# Altium PCB NB3000XN.PcbDoc (part 36 of 71)
Units mil, origin at the board's own origin, x right, y up, seen from the top; angles counter-clockwise.
Board outline 9527.56 x 6929.77 mil, 6 copper layers (Top Layer, GND+SHIELD, MidLayer1, MidLayer2, P2 - 3V3+5V0, Bottom Layer), stack 62.375 mil thick; 832 components, 1027 nets, 4655 pads, 4981 vias.
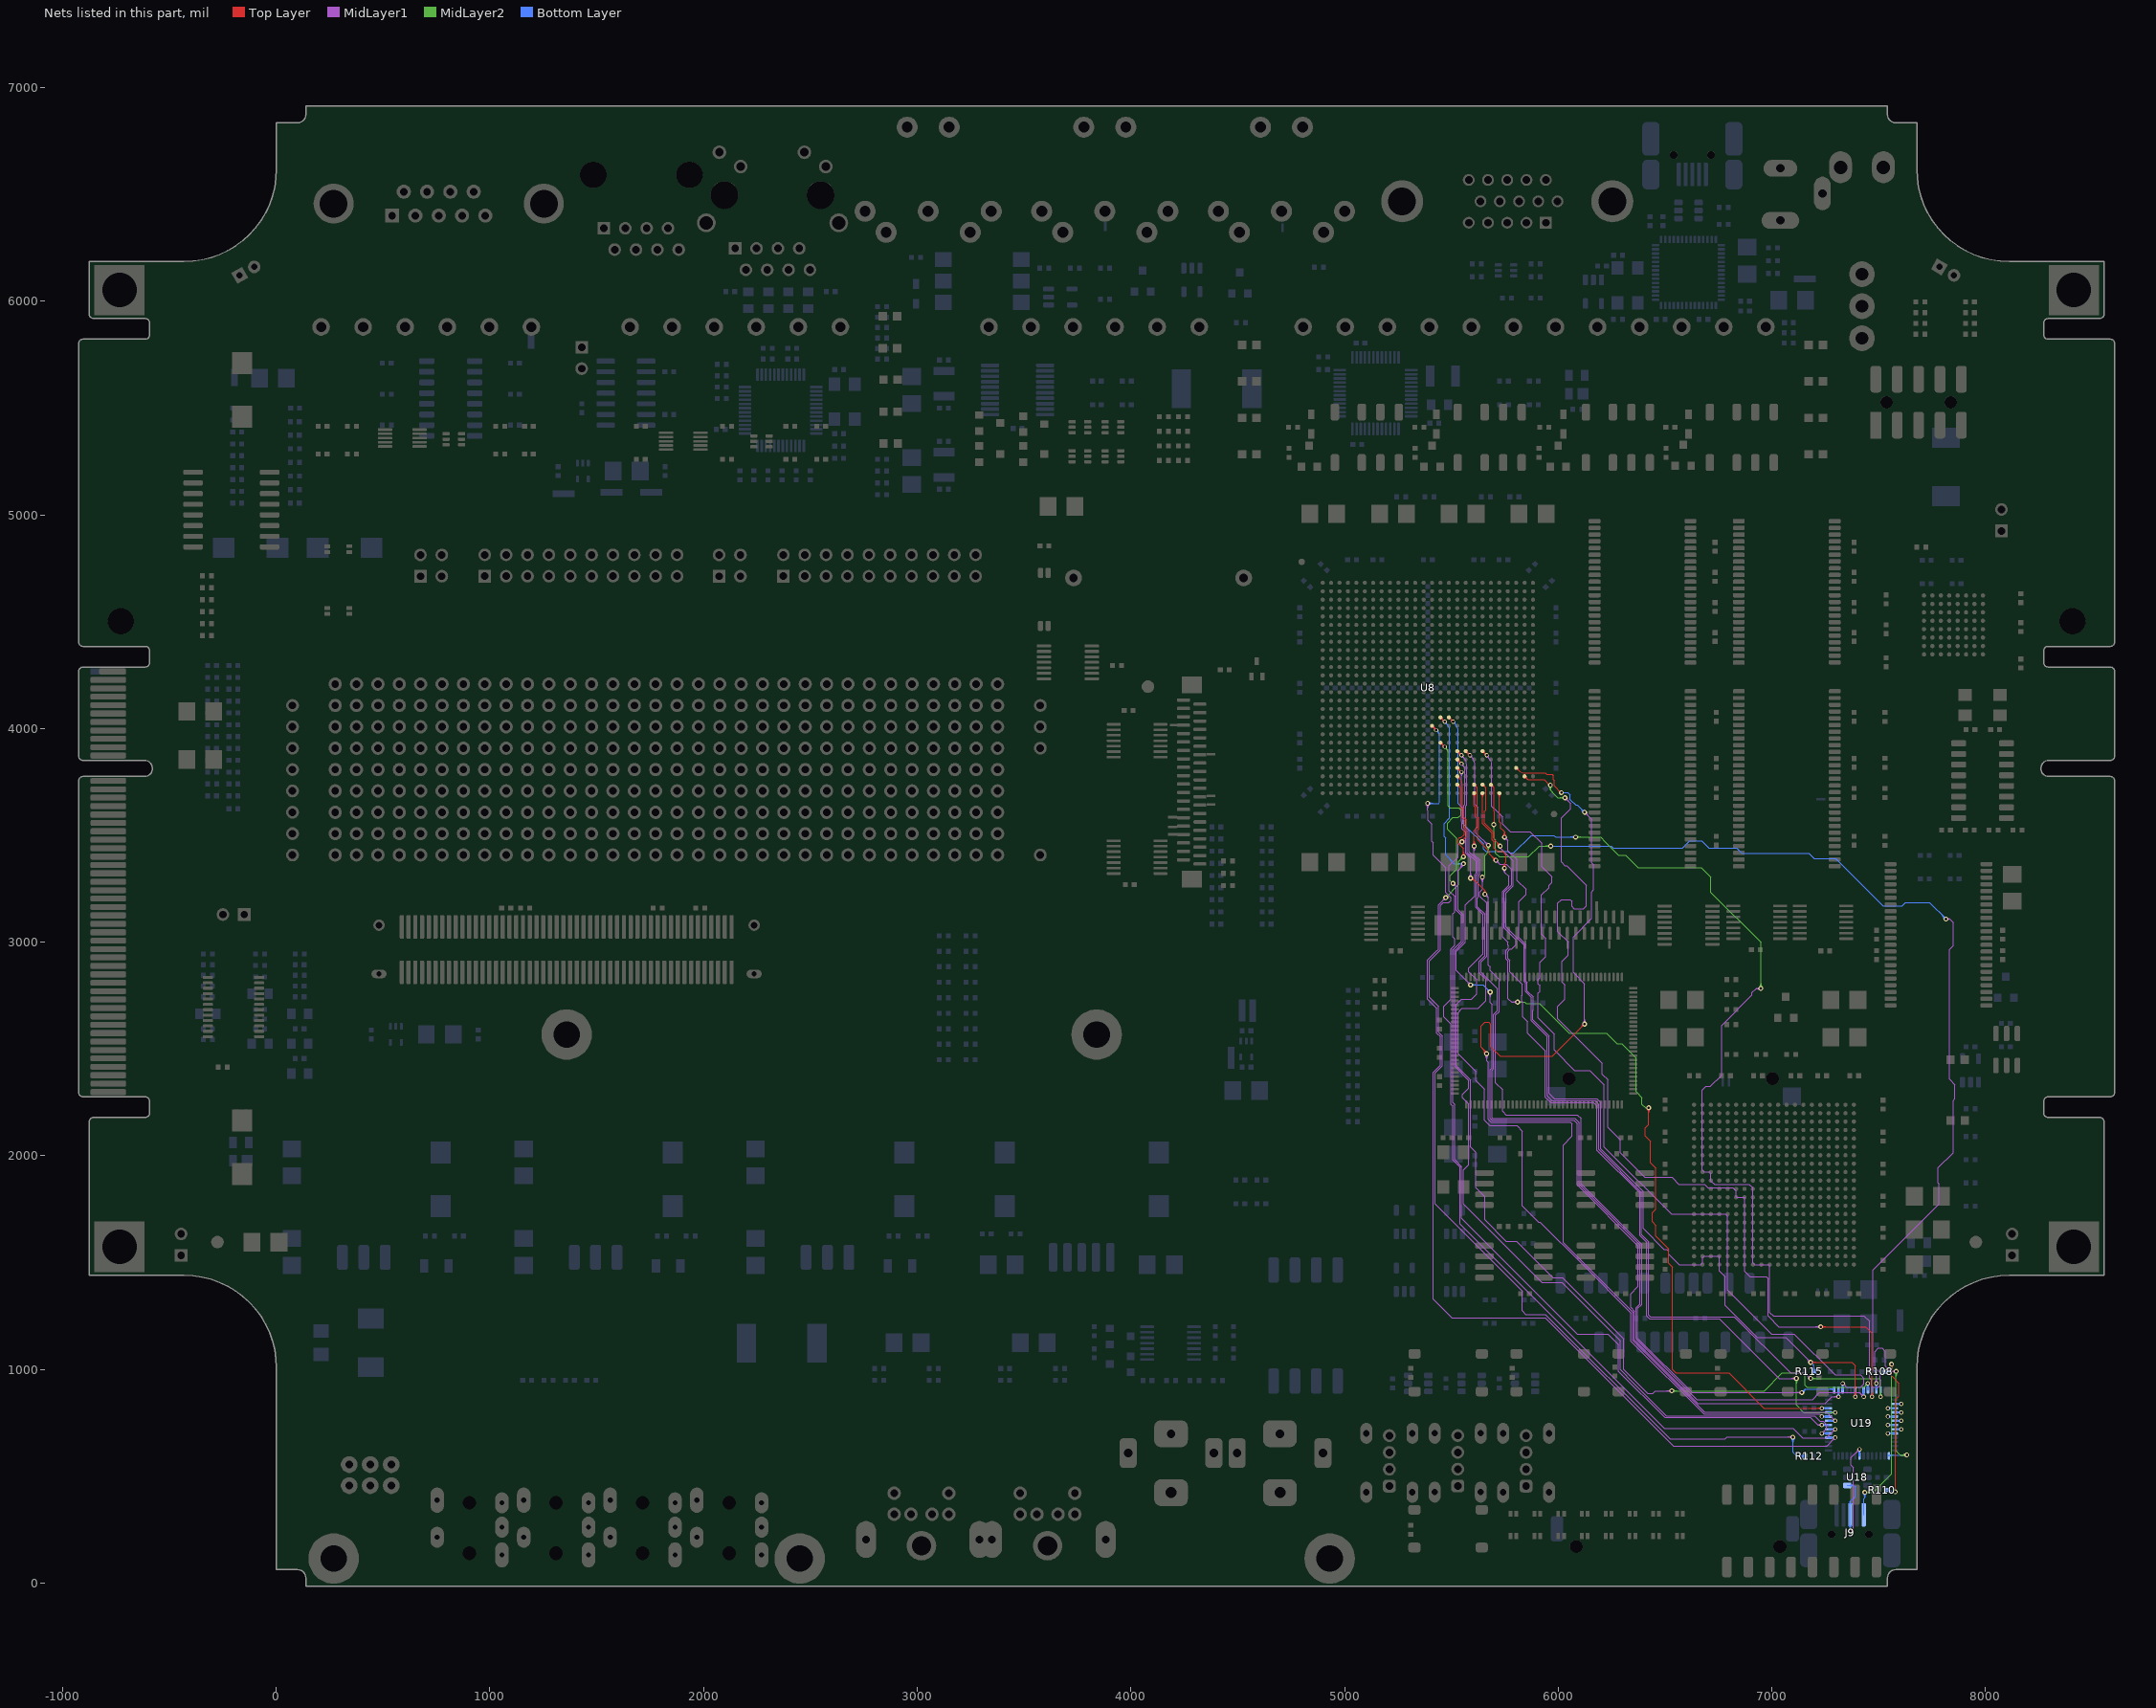
[diagram p40: the nets of this part, all layers, seen from the top]

## Via types
v1: diameter 23, hole 11.81, Top Layer to Bottom Layer, 3672 vias
v2: diameter 26, hole 11.81, Top Layer to Bottom Layer, 461 vias
v3: diameter 19, hole 11.81, Top Layer to Bottom Layer, tented both sides, 396 vias
v4: diameter 23.62, hole 11.81, Top Layer to Bottom Layer, 288 vias
v5: diameter 20, hole 11.81, Top Layer to Bottom Layer, 91 vias
v6: diameter 23, hole 11.81, Top Layer to Bottom Layer, tented both sides, 50 vias
v7: diameter 31, hole 11.81, Top Layer to Bottom Layer, 15 vias
v8: diameter 27.56, hole 11.81, Top Layer to Bottom Layer, tented both sides, 4 vias
v9: diameter 29, hole 11.81, Top Layer to Bottom Layer, 3 vias
v10: diameter 21, hole 11.81, Top Layer to Bottom Layer, 1 vias

## Nets (pads, with @x,y where several pads share a name; then routed paths per layer and width w, separated by ;. In a path a pad name is that pad's centre, name@x,y a point inside that pad or via, vN(x,y) a via of type N, cw(c..) or ccw(c..) an arc to the next point about the centre after c; other vN are vias at no path point) (continued)
DBUSB#.DPLUS: J9.3 U18.1 U19.8 | length 878.2
  MidLayer1 w5: v4(7367.01,242.01) 7381.47,256.47 7381.47,541.46 7370,552.93 7370,586.84 v5(7410.16,627) ; v5@7402.66,627 cw(c7384.55,627) 7397.35,614.2 cw(c7410.16,601.39) v5@7410.16,619.5
  Bottom Layer w5: U18.1@7352.76,457.6 7382.4,457.6 ; v4@7360.42,248.59 ccw(c7344.53,264.49) 7367.01,264.49 ccw(c7389.49,264.49) v4@7373.59,248.59 ; J9.3@7361.82,269.53 cw(c7349.28,257) 7367.01,257 cw(c7384.73,257) J9.3@7372.2,269.53 ; J9.3@7362.04,370.68 ccw(c7351.61,382.01) 7367.01,382.01 ; v4@7365,240 v4(7367.01,242.01) J9.3@7367.01,320 7367.01,382.01 ; U18.1@7367.41,450.47 cw(c7382.4,438.26) 7382.4,457.6 ; U18.1@7367.41,464.72 ccw(c7382.4,476.94) 7382.4,457.6 ; J9.3@7371.98,370.68 cw(c7382.4,382.01) 7367.01,382.01 ; 7367.01,382.01 7389.5,404.5 7389.5,450.5 7382.4,457.6
  Bottom Layer w8: v5@7405.91,622.76 cw(c7395.67,612.51) 7410.16,612.51 cw(c7424.64,612.51) v5@7414.4,622.76 ; U19.8@7410.16,595.67 v5(7410.16,627)
DBUSB#.VBUS: J9.1 R108.2 R110.1 | length 1876.7
  Top Layer w4: v1@7553.51,1018.28 cw(c7537.85,1002.62) 7560,1002.62 ; v1@7556.34,1021.11 cw(c7547.51,1012.28) 7560,1012.28 ; 7560,1001.51 cw(c7583.72,1001.51) v1@7566.95,1018.28 ; 7560,1011.16 cw(c7574.07,1011.16) v1@7564.12,1021.11 ; v1@7560.23,1024.77 7560,1025 7560,970 7595,935 7595,875 7577.85,857.85 v1(7577.85,427.15)
  MidLayer2 w4: v1(7435,425) 7473.48,425 7560.23,511.75 v1(7560.23,1025) ; v1@7438.89,421.11 cw(c7448.28,411.72) 7448.28,425 cw(c7448.28,438.28) v1@7438.89,428.89 ; v1@7441.72,418.28 cw(c7457.94,402.06) 7457.94,425 cw(c7457.94,447.93) v1@7441.72,431.72 ; v1@7553.51,1018.28 cw(c7537.3,1002.06) 7560.23,1002.06 cw(c7583.17,1002.06) v1@7566.95,1018.28 ; v1@7556.34,1021.11 cw(c7546.95,1011.72) 7560.23,1011.72 cw(c7573.51,1011.72) v1@7564.12,1021.11
  Bottom Layer w4: v1@7428.28,418.28 cw(c7412.06,402.06) 7435,402.06 cw(c7457.94,402.06) v1@7441.72,418.28 ; J9.1@7430,320 7430,395 7435,400 v1(7435,425) ; v1@7431.11,421.11 cw(c7421.72,411.72) 7435,411.72 cw(c7448.28,411.72) v1@7438.89,421.11 ; R108.2@7526.18,990 7551.82,990 7560,998.18 7560,1025 v1(7560.23,1025) ; R108.2@7529.94,986.24 cw(c7539.02,977.16) 7539.02,990 cw(c7539.02,1002.84) R108.2@7529.94,993.76 ; R108.2@7532.77,983.41 cw(c7548.68,967.5) 7548.68,990 cw(c7548.68,1012.5) R108.2@7532.77,996.59 ; R110.1@7536.18,435 7555,435 ; R110.1@7543.59,429.35 cw(c7555,420.66) 7555,435 ; R110.1@7543.59,440.65 ccw(c7555,449.34) 7555,435 ; v1@7553.51,1018.28 cw(c7537.85,1002.62) 7560,1002.62 ; v1@7556.34,1021.11 cw(c7547.51,1012.28) 7560,1012.28 ; 7560,1001.51 cw(c7583.72,1001.51) v1@7566.95,1018.28 ; 7560,1011.16 cw(c7574.07,1011.16) v1@7564.12,1021.11 ; v1(7577.85,427.15) 7562.85,427.15 7555,435
DBUSB.D0: U8.AE17 U19.18 | length 5113.6
  Top Layer w4: v1@5550.14,3406.76 ccw(c5533.92,3422.98) 5556.86,3422.98 ccw(c5579.79,3422.98) v1@5563.57,3406.76 ; v1@5552.97,3403.93 ccw(c5543.58,3413.32) 5556.86,3413.32 ccw(c5570.14,3413.32) v1@5560.75,3403.93 ; v1(5556.86,3400.04) 5556.86,3438.04 5531.02,3463.87 5531.02,3482.29 5537.92,3489.19 5545.69,3489.19 5560.81,3504.31 5560.81,3570.31 5551.17,3579.96 5551.17,3621.52 5543.3,3629.39 5543.3,3660 5543.3,3670 5543.3,3717.53 ; 5540.33,3724.71 cw(c5533.15,3717.53) 5543.3,3717.53 ; 5540.33,3724.71 cw(c5533.15,3717.53) 5543.3,3717.53 ; 5540.33,3724.71 ccw(c5527.8,3712.17) 5527.8,3729.9 cw(c5527.8,3712.17) 5540.33,3724.71 ; 5540.33,3724.71 cw(c5552.86,3737.24) 5535.14,3737.24 ccw(c5552.86,3737.24) 5540.33,3724.71
  MidLayer1 w4: v1@5464.02,3208.37 cw(c5441.09,3208.37) 5457.31,3192.16 cw(c5473.52,3175.94) v1@5473.52,3198.87 ; v1@5465.19,3208.37 v1(5473.52,3208.37) 5448.52,3183.37 5440.19,3175.04 5440.19,3044.69 5440.19,3035 5440.19,2967.22 5431.47,2958.5 5431.12,2958.5 5411.5,2938.88 5411.5,2938.53 5389.52,2916.56 5389.52,2734.04 5431.86,2691.71 5431.86,2575.04 5448.52,2558.37 5448.52,2425.04 5415.19,2391.71 5415.19,1329.81 5503.29,1241.71 5940.19,1241.71 6540.19,641.71 7257.6,641.71 v5(7297,681.1) v5@7298.52,681.11 ; v1@5468.02,3208.37 cw(c5454.75,3208.37) 5464.14,3198.99 cw(c5473.52,3189.6) v1@5473.52,3202.87 ; v5@7289,681.1 cw(c7269.69,681.1) 7283.34,667.45 cw(c7297,653.79) v5@7297,673.1
  MidLayer2 w4: v1(5473.52,3208.37) 5535,3269.85 5535,3378.18 v1(5556.86,3400.04) v1@5556.86,3393.37 ; v1@5473.52,3213.87 ccw(c5473.52,3227.15) 5482.91,3217.76 ccw(c5492.3,3208.37) v1@5479.02,3208.37 ; v1@5473.52,3217.87 ccw(c5473.52,3240.81) 5489.74,3224.59 ccw(c5505.96,3208.37) v1@5483.02,3208.37 ; v1@5547.36,3400.04 cw(c5524.42,3400.04) 5540.64,3383.82 cw(c5556.86,3367.61) v1@5556.86,3390.54 ; v1@5551.36,3400.04 cw(c5538.08,3400.04) 5547.47,3390.65 cw(c5556.86,3381.26) v1@5556.86,3394.54
  Bottom Layer w8: U19.18@7265.67,681.1 v5(7297,681.1) ; v5@7292.76,676.86 ccw(c7282.51,666.62) 7282.51,681.1 ccw(c7282.51,695.59) v5@7292.76,685.35
DBUSB.D1: U8.U15 U19.19 | length 5063.4
  Top Layer w4: U8.U15@5449.06,4044.7 cw(c5449.06,4026.6) 5461.86,4039.4 cw(c5474.66,4052.2) U8.U15@5456.56,4052.2 ; U8.U15@5449.06,4044.86 cw(c5449.06,4027.14) 5461.59,4039.67 cw(c5474.12,4052.2) U8.U15@5456.4,4052.2 ; U8.U15@5449.06,4052.2 v3(5468.74,4032.52) ; 5455.94,4045.32 cw(c5443.13,4032.52) 5461.24,4032.52 ccw(c5443.13,4032.52) 5455.94,4045.32 ; 5455.94,4045.32 ccw(c5468.74,4058.13) 5468.74,4040.02 cw(c5468.74,4058.13) 5455.94,4045.32
  MidLayer1 w4: 5535.93,3340.11 ccw(c5508.33,3367.71) v1@5547.36,3367.71 ; 5542.75,3346.94 ccw(c5521.98,3367.71) v1@5551.36,3367.71 ; 5549.58,3353.77 ccw(c5535.64,3367.71) v1@5555.36,3367.71 ; 5552.02,3356.2 cw(c5556.86,3351.37) v1@5556.86,3358.21 ; v1(5556.86,3367.71) 5556.86,3361.04 5531.86,3336.04 5531.86,3152.36 5556.86,3127.36 5556.86,3002.02 5515.19,2960.35 5515.19,2418.69 5581.86,2352.02 5581.86,2317.05 5552.19,2287.38 5552.19,2272.62 5581.86,2242.95 5581.86,1958.37 5556.86,1933.37 5556.86,1775.04 5731.86,1600.04 5923.52,1408.37 6016.82,1408.37 6290.19,1135 6290.19,1000.04 6349.65,940.58 6506.86,783.37 7200,783.37 7225,758.37 7240.19,758.37 7256.86,741.71 7256.86,723.31 v5(7234.34,700.79) ; v5@7234.34,708.79 ccw(c7234.34,728.1) 7247.99,714.44 ccw(c7261.66,700.79) v5@7242.34,700.79
  Bottom Layer w4: v3@5468.09,4025.05 cw(c5466.51,4007.01) 5480.38,4018.65 ; v3@5476.21,4031.87 ccw(c5494.25,4030.29) 5480.38,4018.65 ; v1@5550.14,3360.99 ccw(c5533.92,3344.77) 5533.92,3367.71 ccw(c5533.92,3390.64) v1@5550.14,3374.43 ; v1@5552.97,3363.82 ccw(c5543.58,3354.43) 5543.58,3367.71 ccw(c5543.58,3380.99) v1@5552.97,3371.6 ; v1(5556.86,3367.71) 5514.92,3367.71 5473.19,3409.44 5473.19,3487.36 5465.8,3494.75 5465.8,3555 5492.6,3581.8 5492.6,3660 5492.6,3670 5492.6,3876.1 5492.6,3895.52 5492.6,3969.64 5492.6,3989.14 ccw(c5450.87,3989.14) 5480.38,4018.65
  Bottom Layer w8: v5(7234.34,700.79) U19.19@7265.67,700.79 ; v5@7238.58,696.54 cw(c7248.82,686.3) 7248.82,700.79 cw(c7248.82,715.27) v5@7238.58,705.03
DBUSB.D2: U8.AD17 U19.20 | length 4643.9
  Top Layer w4: v1(5550,3470) 5550,3473.56 5548.52,3475.04 5560.19,3486.71 ; v1@5550,3479.5 ccw(c5550,3486.7) 5555.09,3481.61 ; v1@5554.85,3472.59 cw(c5562.56,3476.71) 5556.38,3482.89 ; v1@5558.38,3474.48 cw(c5567.53,3479.37) 5560.19,3486.71 ; 5540.33,3764.08 cw(c5512.98,3736.73) 5551.66,3736.73 ; 5540.33,3764.08 cw(c5512.98,3736.73) 5551.66,3736.73 ; 5540.33,3764.08 cw(c5552.86,3776.61) 5535.14,3776.61 ccw(c5552.86,3776.61) 5540.33,3764.08 ; 5540.33,3764.08 ccw(c5527.8,3751.55) 5527.8,3769.27 cw(c5527.8,3751.55) 5540.33,3764.08 ; 5551.66,3736.73 5551.66,3670 5551.66,3660 5551.66,3633.34 5559.17,3625.83 5559.17,3620 5559.17,3612.36 5559.17,3583.27 5568.81,3573.63 5568.81,3564 5568.81,3495.33 5560.19,3486.71
  MidLayer1 w4: 5533.74,3460.26 cw(c5545.25,3448.76) v1@5548.8,3464.63 ; 5538.39,3464.91 ccw(c5533.3,3470) v1@5540.5,3470 ; 5538.89,3465.4 cw(c5547.13,3457.16) v1@5549.67,3468.54 ; v1(5550,3470) 5550,3473.56 5548.52,3475.04 5546.74,3473.26 5531.86,3458.37 5531.86,3399.37 5489.86,3357.37 5489.86,3239.67 5515.19,3214.34 5515.19,3141.71 5506.86,3133.37 5506.86,3025.04 5516.19,3015.71 5516.19,2986.19 5498.52,2968.52 5498.52,2733.37 5464.19,2699.04 5464.19,2651.04 5498.52,2616.71 5498.52,2241.71 5506.86,2233.37 5506.86,1980.39 5540.19,1947.06 5540.19,1681.37 6088.19,1133.37 6496.5,725.04 7098.52,725.04 7143.56,680 7256.53,680 v5@7290.19,713.66 ; v5@7289,720.47 cw(c7269.69,720.47) 7283.34,706.82 cw(c7297,693.16) v5@7297,712.47 ; v5@7290.19,713.66 v5(7297,720.47) 7290.19,720.47 v5@7290.19,713.66
  Bottom Layer w8: U19.20@7265.67,720.47 v5(7297,720.47) ; v5@7292.76,716.23 ccw(c7282.51,705.99) 7282.51,720.47 ccw(c7282.51,734.96) v5@7292.76,724.72
DBUSB.D3: U8.Y15 U19.21 | length 4912.9
  Top Layer w4: U8.Y15@5449.06,3926.59 cw(c5449.06,3908.49) 5461.86,3921.29 cw(c5474.66,3934.09) U8.Y15@5456.56,3934.09 ; U8.Y15@5449.06,3926.75 cw(c5449.06,3909.03) 5461.59,3921.56 cw(c5474.12,3934.09) U8.Y15@5456.4,3934.09 ; U8.Y15@5449.06,3934.09 v3(5468.74,3914.41) ; 5455.94,3927.21 cw(c5443.13,3914.41) 5461.24,3914.41 ccw(c5443.13,3914.41) 5455.94,3927.21 ; 5455.94,3927.21 ccw(c5468.74,3940.02) 5468.74,3921.91 cw(c5468.74,3940.02) 5455.94,3927.21
  MidLayer1 w4: 5506.7,2919.53 5506.7,2963.17 5548.52,3005 5548.52,3124.37 5523.52,3149.37 5523.52,3259.04 ; 5506.86,2919.53 5506.86,2250.04 5515.19,2241.71 5515.19,1983.37 5548.52,1950.04 5548.52,1708.37 6090.19,1166.71 6231.86,1166.71 6281.86,1116.71 6281.86,991.71 6498.52,775.04 7179.96,775.04 7214.84,740.16 ; v1(5507.52,3275.04) 5523.52,3259.04 ; v1@5507.58,3269.54 cw(c5507.7,3256.69) 5516.79,3265.78 cw(c5525.87,3274.86) v1@5513.02,3274.99 ; v1@5507.62,3265.54 cw(c5507.83,3243.35) 5523.52,3259.04 ; v1@5517.02,3274.95 ccw(c5539.22,3274.74) 5523.52,3259.04 ; 7215,740 7214.84,740.16 ; v5@7228.68,734.5 ccw(c7215.03,720.85) 7215.03,740.16 ccw(c7215.02,759.47) v5@7228.68,745.81 ; v5(7234.34,740.16) 7214.84,740.16
  MidLayer2 w4: v3@5468.09,3906.94 cw(c5466.51,3888.9) 5480.38,3900.54 cw(c5494.25,3912.18) v3@5476.21,3913.76 ; 5480.13,3900.83 cw(c5470.2,3890.9) 5484.25,3890.9 ; 5484.25,3680.84 5484.25,3739.1 ; 5484.25,3876.97 5484.25,3890.9 ; v1(5507.52,3275.04) 5493.52,3289.04 5493.52,3311.71 5524.02,3342.21 5524.02,3486.17 5481.86,3528.33 5481.86,3558.37 5506.86,3583.37 5532.86,3583.37 5544.52,3595.04 5544.52,3617.04 5533.56,3628 5493.29,3628 5484.25,3637.04 5484.25,3660 5484.25,3670 5484.25,3739.1 ; 5484.25,3739.1 5484.25,3797.36 5484.25,3890.9
  Bottom Layer w8: v5(7234.34,740.16) U19.21@7265.67,740.16 ; v5@7238.58,735.91 cw(c7248.82,725.67) 7248.82,740.16 cw(c7248.82,754.64) v5@7238.58,744.4
DBUSB.D4: U8.AC24 U19.22 | length 5835.8
  Top Layer w4: 5645.2,2503.36 cw(c5619.88,2478.04) v1@5655.69,2478.04 ; 5652.03,2496.54 cw(c5633.53,2478.04) v1@5659.69,2478.04 ; 5658.08,2490.49 ccw(c5665.19,2497.6) v1@5665.19,2487.54 ; 5658.86,2489.71 cw(c5647.19,2478.04) v1@5663.69,2478.04 ; v1(5665.19,2478.04) 5665.19,2483.37 5640.19,2508.37 5640.19,2608.37 5656.86,2625.04 5675,2625.04 5685,2615.04 5685,2510 5728.29,2466.71 5973.52,2466.71 v1(6123.52,2616.71) ; 5971.94,3784.71 5976.5,3780.15 ; v1(6015.19,3700.04) 6012.14,3700.04 5981.19,3731 5981.19,3756.43 5976.5,3761.12 5976.5,3780.15 ; v1@6114.02,2616.71 cw(c6091.09,2616.71) 6107.31,2600.49 cw(c6123.52,2584.27) v1@6123.52,2607.21 ; v1@6118.02,2616.71 cw(c6104.75,2616.71) 6114.14,2607.32 cw(c6123.52,2597.93) v1@6123.52,2611.21 ; 5815.92,3803.45 ccw(c5803.39,3790.92) 5803.39,3808.64 cw(c5803.39,3790.92) 5815.92,3803.45 ; 5815.92,3803.45 cw(c5828.45,3815.98) 5810.73,3815.98 ccw(c5828.45,3815.98) 5815.92,3803.45 ; 5843.27,3792.12 cw(c5843.27,3830.8) 5815.92,3803.45 ccw(c5843.27,3830.8) 5843.27,3792.12 ; 5843.27,3792.12 5910,3792.12 5920,3792.12 5939.38,3792.12 5946.29,3785.21 5971.44,3785.21 5976.5,3780.15
  MidLayer1 w4: v1@5658.47,2471.32 cw(c5642.26,2455.11) 5665.19,2455.11 cw(c5688.13,2455.11) v1@5671.91,2471.32 ; v1@5661.3,2474.15 cw(c5651.91,2464.76) 5665.19,2464.76 cw(c5678.47,2464.76) v1@5669.08,2474.15 ; v1(5665.19,2478.04) 5665.19,2444.69 5673.52,2436.35 5673.52,2172.06 5687.21,2158.37 6056.86,2158.37 6065.19,2150.04 6065.19,2092.71 6023.52,2051.04 6023.52,1593.02 6348.52,1268.02 6348.52,1136.35 6684.84,800.04 7256.8,800.04 v5(7297,759.84) 7298.52,759.84 v5@7298.52,766.71 ; v1@6116.81,2623.43 ccw(c6100.59,2639.64) 6123.52,2639.64 ccw(c6146.46,2639.64) v1@6130.24,2623.43 ; v1@6119.64,2620.6 ccw(c6110.25,2629.99) 6123.52,2629.99 ccw(c6136.8,2629.99) v1@6127.41,2620.6 ; v1(6123.52,2616.71) 6123.52,2805.71 6070.86,2858.37 6070.86,3025.04 6156.86,3111.04 6156.86,3210 6156.86,3235.69 6166.19,3245.02 6166.19,3250.04 6166.19,3275 6166.19,3362.12 6156.86,3371.45 6156.86,3575.04 v1(6123.52,3608.37) ; v1@6123.52,3598.87 cw(c6123.52,3575.94) 6139.74,3592.16 cw(c6155.96,3608.37) v1@6133.02,3608.37 ; v1@6123.52,3602.87 cw(c6123.52,3589.6) 6132.91,3598.99 cw(c6142.3,3608.37) v1@6129.02,3608.37 ; v5@7289,759.84 ccw(c7269.69,759.84) 7283.34,773.5 ccw(c7297,787.16) v5@7297,767.84
  Bottom Layer w4: v1(6015.19,3700.04) 6045.18,3700.03 6056.86,3688.37 6056.86,3666.71 6081.86,3641.71 6090.19,3641.71 v1(6123.52,3608.37) ; v1@6114.02,3608.37 ccw(c6091.09,3608.37) 6107.31,3624.59 ccw(c6123.52,3640.81) v1@6123.52,3617.87 ; v1@6118.02,3608.37 ccw(c6104.75,3608.37) 6114.13,3617.76 ccw(c6123.52,3627.15) v1@6123.52,3613.87
  Bottom Layer w8: U19.22@7265.67,759.84 v5(7297,759.84) ; v5@7292.76,755.6 ccw(c7282.51,745.36) 7282.51,759.84 ccw(c7282.51,774.33) v5@7292.76,764.09
DBUSB.D5: U8.AF19 U19.23 | length 4406.9
  Top Layer w4: v1@5600.14,3456.76 ccw(c5583.92,3472.98) 5606.86,3472.98 ccw(c5629.79,3472.98) v1@5613.57,3456.76 ; U8.AF19@5601.23,3692.57 cw(c5588.43,3679.77) 5606.54,3679.77 cw(c5624.64,3679.77) U8.AF19@5611.84,3692.57 ; U8.AF19@5601.34,3692.68 cw(c5588.81,3680.15) 5606.54,3680.15 cw(c5624.26,3680.15) U8.AF19@5611.73,3692.68 ; v1@5602.97,3453.93 ccw(c5593.58,3463.32) 5606.86,3463.32 ccw(c5620.14,3463.32) v1@5610.75,3453.93 ; U8.AF19@5606.54,3697.87 5606.54,3670 5606.54,3660 5606.54,3637.11 5611.69,3631.96 5611.69,3586.87 5620,3578.56 5620,3534.23 5606.86,3521.09 v1(5606.86,3450.04)
  MidLayer1 w4: v1@5600.14,3443.32 cw(c5583.92,3427.11) 5606.86,3427.11 cw(c5629.79,3427.11) v1@5613.57,3443.32 ; v1@5602.97,3446.15 cw(c5593.58,3436.76) 5606.86,3436.76 cw(c5620.14,3436.76) v1@5610.75,3446.15 ; v1(5606.86,3450.04) 5606.86,3410.32 5632.19,3384.98 5632.19,3316.94 5625.19,3309.94 5625.19,3211.04 5622.52,3208.37 5622.52,3166.04 5657.19,3131.37 5657.19,2937.69 5630,2910.5 5630,2857.25 5660.86,2826.39 5660.86,2725.86 5625,2690 5550,2690 5531.19,2671.19 5531.19,2478 5615.19,2394 5615.19,2352.63 5655.41,2312.41 5655.41,2166.3 5680,2141.71 5806.86,2141.71 5832.5,2116.06 5832.5,1766.06 5908.52,1690.04 5915.19,1690.04 6113.52,1491.71 6340.52,1264.71 6340.52,1133.04 6681.86,791.71 7200,791.71 7222.16,791.71 v5(7234.34,779.53) 7231.86,779.52 v5@7231.86,779.71
  Bottom Layer w8: v5(7234.34,779.53) U19.23@7265.67,779.53 ; v5@7238.58,775.28 cw(c7248.82,765.04) 7248.82,779.53 cw(c7248.82,794.01) v5@7238.58,783.77
DBUSB.D6: U8.AE19 U19.24 | length 4633.8
  Top Layer w4: U8.AE19@5606.54,3729.9 cw(c5606.54,3712.17) 5619.07,3724.71 ; U8.AE19@5613.88,3737.24 ccw(c5631.6,3737.24) 5619.07,3724.71 ; v1@5698.56,3383.58 ccw(c5675.63,3383.58) 5691.85,3399.8 ccw(c5708.06,3416.02) v1@5708.06,3393.08 ; v1@5702.56,3383.58 ccw(c5689.29,3383.58) 5698.67,3392.97 ccw(c5708.06,3402.36) v1@5708.06,3389.08 ; v1@5706.86,3384.79 5677.36,3414.28 5677.36,3424.2 5623.52,3478.04 5623.52,3525 5628,3529.48 5628,3581.88 5622.04,3587.84 5622.04,3660 5622.04,3670 5622.04,3717.53 ccw(c5611.89,3717.53) 5619.07,3724.71
  MidLayer1 w4: v1@5706.86,3382.37 v1(5708.06,3383.58) 5727.6,3364.04 5757.52,3364.04 5781.86,3339.71 5781.86,3268.04 5747.86,3234.04 5747.86,3067.33 5803.48,3011.71 5803.48,2988.29 5782.73,2967.54 5774.61,2967.54 5764.36,2957.29 5764.36,2924.11 5773.19,2915.28 5773.19,2860.5 5827,2806.69 ; v1@5708.06,3374.08 cw(c5708.06,3351.15) 5724.28,3367.36 cw(c5740.5,3383.58) v1@5717.56,3383.58 ; v1@5708.06,3378.08 cw(c5708.06,3364.8) 5717.45,3374.19 cw(c5726.84,3383.58) v1@5713.56,3383.58 ; 5787.06,2846.63 5831.36,2802.32 5831.36,2752.26 5829.19,2750.09 5829.19,2724.31 5833.69,2719.81 5833.69,2650.21 ; v1@7108.47,951.66 ccw(c7092.26,935.44) 7092.26,958.37 ccw(c7092.26,981.31) v1@7108.47,965.09 ; v1@7111.3,954.49 ccw(c7101.91,945.1) 7101.91,958.37 ccw(c7101.91,971.65) v1@7111.3,962.26 ; v1(7115.19,958.37) 7065,958.37 7048.52,958.37 7034.84,958.37 6755.21,1238 6702,1238 6428.31,1238 6414.81,1251.5 6414.81,1595.07 6382.19,1627.69 6382.19,1826.1 6181.86,2026.43 6181.86,2233.37 6165.19,2250.04 5965.19,2250.04 5940.19,2275.04 5940.19,2491.71 5856.86,2575.04 5856.86,2627.04 ; 5833.69,2650.21 5856.86,2627.04 ; 5833.69,2650.21 5856.86,2627.04
  MidLayer2 w4: v1@7108.47,951.66 cw(c7092.26,935.44) 7115.19,935.44 cw(c7138.13,935.44) v1@7121.91,951.66 ; v1@7111.3,954.49 cw(c7101.91,945.1) 7115.19,945.1 cw(c7128.47,945.1) v1@7119.08,954.49 ; v1(7115.19,958.37) 7115.19,833.37 7149.35,799.21 v5(7297,799.21) ; v5@7291.34,793.56 ccw(c7277.68,779.89) 7277.68,799.21 ccw(c7277.69,818.52) v5@7291.34,804.87
  Bottom Layer w8: U19.24@7282.51,799.21 cw(c7282.51,784.73) 7292.76,794.97 ccw(c7282.51,784.73) U19.24@7282.51,799.21 ; U19.24@7282.51,799.21 ccw(c7282.51,813.7) 7292.76,803.46 cw(c7282.51,813.7) U19.24@7282.51,799.21 ; U19.24@7265.67,799.21 v5(7297,799.21) U19.24@7265.67,799.21
DBUSB.D7: U8.AF20 U19.25 | length 4530.8
  Top Layer w4: U8.AF20@5640.6,3692.57 cw(c5627.8,3679.77) 5645.91,3679.77 cw(c5664.01,3679.77) U8.AF20@5651.21,3692.57 ; U8.AF20@5645.91,3697.87 5645.91,3670 5645.91,3660 5645.91,3555.41 5690.86,3510.46 5690.86,3478.33 5699.19,3470 5699.19,3441.71 5715.86,3425.04 5740.19,3425.04 5756.86,3408.37 5756.86,3375 5748.52,3366.67 ; v1@5742.44,3353.67 ccw(c5731.6,3366.67) 5748.52,3366.67 ; v1@5745,3350.6 ccw(c5738.73,3358.12) 5748.52,3358.12 ccw(c5758.32,3358.12) v1@5752.05,3350.6 ; v1(5748.52,3346.37) 5748.52,3366.67 ; v1@5754.61,3353.67 cw(c5765.44,3366.67) 5748.52,3366.67 ; v1@6416.81,2218.32 cw(c6400.59,2202.11) 6423.52,2202.11 cw(c6446.46,2202.11) v1@6430.24,2218.32 ; v1@6419.64,2221.15 cw(c6410.25,2211.76) 6423.52,2211.76 cw(c6436.8,2211.76) v1@6427.41,2221.15 ; v1(6423.52,2225.04) 6423.52,2146.67 6406.86,2130 6406.86,2093.33 6431.86,2068.33 6431.86,1966.71 6456.86,1941.71 6456.86,1750.04 6440.19,1733.37 6440.19,1691.71 6456.86,1675.04 6456.86,1625.04 6518.19,1563.71 6518.19,1496.81 6535,1480 6535,1000 6551.63,983.37 6798.52,983.37 6956.86,825.04 6963,818.9 v5(7234.34,818.9) ; v5@7228.68,813.24 ccw(c7215.02,799.58) 7215.02,818.9 ccw(c7215.02,838.21) v5@7228.68,824.55 ; 5645.91,3680.15 cw(c5663.63,3680.15) 5651.1,3692.68 ccw(c5663.63,3680.15) 5645.91,3680.15 ; 5645.91,3680.15 ccw(c5628.18,3680.15) 5640.71,3692.68 cw(c5628.18,3680.15) 5645.91,3680.15
  MidLayer1 w4: v1@5742.93,3338.69 cw(c5734.94,3327.71) 5748.52,3327.71 ; v1(5748.52,3346.37) 5748.52,3327.71 ; v1@5754.12,3338.69 ccw(c5762.11,3327.71) 5748.52,3327.71 ; v1@5803.28,2713.28 ccw(c5787.06,2697.06) 5787.06,2720 ccw(c5787.06,2742.93) v1@5803.28,2726.72 ; v1@5806.11,2716.11 ccw(c5796.72,2706.72) 5796.72,2720 ccw(c5796.72,2733.28) v1@5806.11,2723.89 ; v1(5810,2720) 5781.55,2720 5765,2736.55 5765,2912.15 5756.36,2920.8 5756.36,2960.6 5768,2972.25 5768,2983.79 5765,2986.79 5765,3000 5739.86,3025.14 5739.86,3237.35 5768.19,3265.69 5768.19,3308.04 5748.52,3327.71
  MidLayer2 w4: v1(5810,2720) 5843.77,2720 5850,2713.77 5913.54,2713.77 6052.31,2575 6225.04,2575 6275,2525.04 6298.52,2525.04 6365.19,2458.37 6365.19,2300.04 6392.86,2272.37 6392.86,2241.71 6409.52,2225.04 v1(6423.52,2225.04) ; v1@5813.89,2716.11 cw(c5823.28,2706.72) 5823.28,2720 cw(c5823.28,2733.28) v1@5813.89,2723.89 ; v1@5816.72,2713.28 cw(c5832.93,2697.06) 5832.93,2720 cw(c5832.93,2742.93) v1@5816.72,2726.72
  Bottom Layer w8: v5(7234.34,818.9) U19.25@7265.67,818.9 ; v5@7238.58,814.66 cw(c7248.82,804.41) 7248.82,818.9 cw(c7248.82,833.38) v5@7238.58,823.14
DBUSB.D8: U19.45 | length 54.1
  Bottom Layer w8: U19.45@7574.33,838.58 v5(7605.66,838.58) ; v5@7601.42,834.34 ccw(c7591.18,824.1) 7591.18,838.58 ccw(c7591.18,853.07) v5@7601.42,842.83
DBUSB.D9: U19.46 | length 54.1
  Bottom Layer w8: v5(7543,818.9) U19.46@7574.33,818.9 ; v5@7547.24,814.65 cw(c7557.48,804.41) 7557.48,818.9 cw(c7557.49,833.38) v5@7547.24,823.14
DBUSB.D10: U19.47 | length 54.1
  Bottom Layer w8: U19.47@7574.33,799.21 v5(7605.66,799.21) ; v5@7601.42,794.97 ccw(c7591.18,784.73) 7591.18,799.21 ccw(c7591.18,813.7) v5@7601.42,803.46
DBUSB.D11: U19.48 | length 54.1
  Bottom Layer w8: v5(7543,779.53) U19.48@7574.33,779.53 ; v5@7547.24,775.28 cw(c7557.48,765.04) 7557.48,779.53 cw(c7557.49,794.01) v5@7547.24,783.77
DBUSB.D12: U19.49 | length 54.1
  Bottom Layer w8: U19.49@7574.33,759.84 v5(7605.66,759.84) ; v5@7601.42,755.6 ccw(c7591.18,745.36) 7591.18,759.84 ccw(c7591.18,774.33) v5@7601.42,764.09
DBUSB.D13: U19.50 | length 54.1
  Bottom Layer w8: v5(7543,740.16) U19.50@7574.33,740.16 ; v5@7547.24,735.91 cw(c7557.48,725.67) 7557.48,740.16 cw(c7557.49,754.64) v5@7547.24,744.4
DBUSB.D14: U19.51 | length 54.1
  Bottom Layer w8: U19.51@7574.33,720.47 v5(7605.66,720.47) ; v5@7601.42,716.23 ccw(c7591.18,705.99) 7591.18,720.47 ccw(c7591.18,734.96) v5@7601.42,724.72
DBUSB.D15: U19.52 | length 54.1
  Bottom Layer w8: v5(7543,700.79) U19.52@7574.33,700.79 ; v5@7547.24,696.54 cw(c7557.48,686.3) 7557.48,700.79 cw(c7557.49,715.27) v5@7547.24,705.03
DBUSB.FIFOADR0: U8.AA17 U19.37 | length 5078.7
  Top Layer w4: U8.AA17@5527.8,3887.22 cw(c5527.8,3869.12) 5540.6,3881.92 cw(c5553.4,3894.72) U8.AA17@5535.3,3894.72 ; U8.AA17@5527.8,3887.38 cw(c5527.8,3869.66) 5540.33,3882.19 cw(c5552.86,3894.72) U8.AA17@5535.14,3894.72 ; U8.AA17@5527.8,3894.72 v3(5547.48,3875.04) ; 5534.68,3887.84 cw(c5521.87,3875.04) 5539.98,3875.04 ccw(c5521.87,3875.04) 5534.68,3887.84 ; 5534.68,3887.84 ccw(c5547.48,3900.65) 5547.48,3882.54 cw(c5547.48,3900.65) 5534.68,3887.84
  MidLayer1 w4: v3@5546.83,3867.57 cw(c5545.25,3849.53) 5559.12,3861.17 ; v3@5554.95,3874.39 ccw(c5572.99,3872.81) 5559.12,3861.17 ; 5571.34,3798.23 5571.34,3812.16 ; 6340,966.71 6418.21,888.5 6443.91,888.5 6455.45,900.04 v1(6531.86,900.04) ; 6340.19,966.71 6306.86,1000.04 6306.86,1143.14 6020,1430 5975,1430 5804.96,1600.04 5756.86,1600.04 5656.86,1700.04 5656.86,1808.37 5615.19,1850.04 5615.19,2016.71 5590.19,2041.71 5590.19,2355 5523.19,2422 5523.19,2708.04 5548.52,2733.37 5593.52,2733.37 5618.52,2758.37 5618.52,2825.04 5581.86,2861.71 5581.86,2878.37 5648.48,2945 5648.48,3128.77 5614.52,3162.73 5614.52,3211.69 5617.19,3214.35 5617.19,3313.25 5624.19,3320.25 5624.19,3381.67 5583.69,3422.17 5583.69,3521.31 5567.19,3537.81 5567.19,3638.31 5571.34,3642.47 5571.34,3660 5571.34,3670 5571.34,3718.62 5571.34,3738.04 5571.34,3812.16 ; v1@6525.14,893.32 ccw(c6508.92,877.11) 6508.92,900.04 ccw(c6508.92,922.98) v1@6525.14,906.76 ; v1@6527.97,896.15 ccw(c6518.58,886.76) 6518.58,900.04 ccw(c6518.58,913.32) v1@6527.97,903.93 ; 5559.12,3861.17 cw(c5529.61,3831.66) 5571.34,3831.66 5571.34,3812.16
  MidLayer2 w4: v1(6531.86,900.04) 6965.19,900.04 7048.52,983.37 7141.63,983.37 7155,970 7155,925 7163.29,916.71 7431.86,916.71 7448.52,933.37 7448.52,935.65 v5(7449.53,935.66) ; v1@6535.75,896.15 cw(c6545.14,886.76) 6545.14,900.04 cw(c6545.14,913.32) v1@6535.75,903.93 ; v1@6538.57,893.32 cw(c6554.79,877.11) 6554.79,900.04 cw(c6554.79,922.98) v1@6538.57,906.76 ; 7434.96,919.81 ccw(c7419.12,935.66) v5@7441.53,935.66 ; 7438.06,922.91 cw(c7449.53,911.45) v5@7449.53,927.66 ; 7441.79,926.64 ccw(c7432.77,935.66) v5@7445.53,935.66
  Bottom Layer w8: v5@7445.28,931.42 cw(c7435.04,921.18) 7449.53,921.18 cw(c7464.01,921.18) v5@7453.77,931.42 ; U19.37@7449.53,904.33 v5(7449.53,935.66)
DBUSB.FIFOADR1: U8.AD25 U19.38 | length 4934.4
  Top Layer w4: 5925.54,3761.11 5924.74,3761.11 ; v1(5963.69,3735.37) 5959.88,3735.37 5934.15,3761.11 5924.74,3761.11 ; v1(7228.52,1200.04) 7439.96,1200.04 7469.21,1170.79 v5(7469.21,873) 7469.21,875.04 v5@7473.52,875.04 ; v1@7232.41,1196.15 cw(c7241.8,1186.76) 7241.8,1200.04 cw(c7241.8,1213.32) v1@7232.41,1203.93 ; v1@7235.24,1193.32 cw(c7251.46,1177.11) 7251.46,1200.04 cw(c7251.46,1222.98) v1@7235.24,1206.76 ; v5@7463.56,878.66 ccw(c7449.9,892.31) 7469.21,892.31 ccw(c7488.53,892.31) v5@7474.87,878.66 ; 5855.29,3764.08 ccw(c5862.47,3771.26) 5862.47,3761.11 ; 5855.29,3764.08 ccw(c5862.47,3771.26) 5862.47,3761.11 ; 5855.29,3764.08 cw(c5867.83,3776.61) 5850.1,3776.61 ccw(c5867.83,3776.61) 5855.29,3764.08 ; 5855.29,3764.08 ccw(c5842.76,3751.55) 5842.76,3769.27 cw(c5842.76,3751.55) 5855.29,3764.08 ; 5862.47,3761.11 5910,3761.11 5920,3761.11 5924.74,3761.11
  MidLayer1 w4: v1@6031.86,3666.54 cw(c6031.86,3643.61) 6048.07,3659.82 cw(c6064.29,3676.04) v1@6041.36,3676.04 ; v1@6031.86,3670.54 cw(c6031.86,3657.26) 6041.25,3666.65 cw(c6050.64,3676.04) v1@6037.36,3676.04 ; v1(6031.86,3676.04) 6057.86,3650.04 6057.86,3625.04 6015.19,3582.37 6015.19,3375.04 6031.86,3358.37 6040.19,3358.37 6131.86,3266.71 6131.86,3171.04 6117.92,3157.1 6074.79,3157.1 6065.19,3166.71 6065.19,3191.71 6056.86,3200.04 6015.19,3200.04 5998.52,3183.37 5998.52,3050.04 6045.81,3002.75 6045.81,2939 6017.19,2910.37 6017.19,2814.71 6031.86,2800.04 6031.86,2733.37 5998.52,2700.04 5998.52,2641.71 6206.86,2433.37 6206.86,2382.04 6231.86,2357.04 6231.86,2133.37 6290.19,2075.04 6290.19,2014.37 6404.52,1900.04 6531.86,1900.04 6565.19,1866.71 6684.86,1866.71 6701.52,1850.04 6818.19,1850.04 6833.19,1835.04 6833.19,1808.37 6835.52,1806.04 6870.19,1806.04 6872.19,1804.04 6872.19,1458.37 6897.19,1433.37 6973.82,1433.37 6982.19,1425 6982.19,1250.37 7032.52,1200.04 v1(7228.52,1200.04) ; v1@7221.81,1193.32 ccw(c7205.59,1177.11) 7205.59,1200.04 ccw(c7205.59,1222.98) v1@7221.81,1206.76 ; v1@7224.64,1196.15 ccw(c7215.25,1186.76) 7215.25,1200.04 ccw(c7215.25,1213.32) v1@7224.64,1203.93
  MidLayer2 w4: v1@5956.97,3728.66 cw(c5940.75,3712.44) 5963.69,3712.44 cw(c5986.62,3712.44) v1@5970.41,3728.66 ; v1@5959.8,3731.49 cw(c5950.41,3722.1) 5963.69,3722.1 cw(c5976.97,3722.1) v1@5967.58,3731.49 ; v1(5963.69,3735.37) 5963.69,3710.88 5982.07,3692.5 ; 5971.52,3703.04 5998.52,3676.04 v1(6031.86,3676.04) ; v1@6025.14,3669.32 ccw(c6008.92,3653.11) 6008.92,3676.04 ccw(c6008.92,3698.98) v1@6025.14,3682.76 ; v1@6027.97,3672.15 ccw(c6018.58,3662.76) 6018.58,3676.04 ccw(c6018.58,3689.32) v1@6027.97,3679.93
  Bottom Layer w8: v5@7464.97,877.24 ccw(c7454.73,887.49) 7469.21,887.49 ccw(c7483.7,887.48) v5@7473.46,877.24 ; v5(7469.21,873) U19.38@7469.21,904.33
DBUSB.FIFOADR2: U8.AA18 U19.36 | length 5006.5
  Top Layer w4: U8.AA18@5567.17,3887.22 cw(c5567.17,3869.12) 5579.97,3881.92 cw(c5592.77,3894.72) U8.AA18@5574.67,3894.72 ; U8.AA18@5567.17,3887.38 cw(c5567.17,3869.66) 5579.7,3882.19 cw(c5592.23,3894.72) U8.AA18@5574.51,3894.72 ; U8.AA18@5567.17,3894.72 v3(5586.85,3875.04) ; 5574.05,3887.84 cw(c5561.24,3875.04) 5579.35,3875.04 ccw(c5561.24,3875.04) 5574.05,3887.84 ; 5574.05,3887.84 ccw(c5586.85,3900.65) 5586.85,3882.54 cw(c5586.85,3900.65) 5574.05,3887.84
  MidLayer1 w4: v3@5586.2,3867.57 cw(c5584.62,3849.53) 5598.49,3861.17 ; v3@5594.32,3874.39 ccw(c5612.36,3872.81) 5598.49,3861.17 ; 5610.71,3798.23 5610.71,3812.16 ; v1@5638.28,3298.28 cw(c5622.06,3282.06) 5645,3282.06 cw(c5667.93,3282.06) v1@5651.72,3298.28 ; 5640.19,3242.71 5633.19,3235.71 ; v1@5641.11,3301.11 cw(c5631.72,3291.72) 5645,3291.72 cw(c5658.28,3291.72) v1@5648.89,3301.11 ; v1(5645,3305) 5645,3247.52 5633.19,3235.71 ; 5655.03,3471.2 ccw(c5673.52,3489.7) v1@5673.52,3463.54 ; 5658.25,3467.98 cw(c5644.31,3454.04) v1@5664.02,3454.04 ; 5661.86,3464.37 ccw(c5673.52,3476.04) v1@5673.52,3459.54 ; v1(5673.52,3454.04) 5672.19,3454.04 5615.19,3511.04 5615.19,3533.37 5624.52,3542.71 5624.52,3631.79 5610.71,3645.6 5610.71,3660 5610.71,3670 5610.71,3718.62 5610.71,3738.04 5610.71,3812.16 ; v5@7421.84,873 ccw(c7402.52,873) 7416.18,886.66 ccw(c7429.84,900.31) v5@7429.84,881 ; v5@7429.84,875.04 v5(7429.84,873) 7411.14,891.71 7223.52,891.71 7190.19,858.37 6649.13,858.37 6364.52,1142.98 6364.52,1289.52 6382.81,1307.81 6382.81,1581.81 6098.52,1866.1 6098.52,2155 6078.82,2174.71 5693.5,2174.71 5690.19,2178.02 5690.19,2400.04 5698.52,2408.37 5698.52,2661.36 5715.86,2678.69 5715.86,2782.71 5639.19,2859.37 5639.19,2908.37 5665.19,2934.37 5665.19,3183.37 5633.19,3215.37 5633.19,3235.71 ; 5598.49,3861.17 cw(c5568.98,3831.66) 5610.71,3831.66 5610.71,3812.16
  MidLayer2 w4: v1(5645,3305) 5656.19,3316.19 5656.19,3404.67 5673.52,3422 v1(5673.52,3454.04) ; v1@5666.81,3447.32 cw(c5650.59,3431.11) 5673.52,3431.11 cw(c5696.46,3431.11) v1@5680.24,3447.32 ; v1@5669.64,3450.15 cw(c5660.25,3440.76) 5673.52,3440.76 cw(c5686.8,3440.76) v1@5677.41,3450.15
  Bottom Layer w8: v5@7425.6,877.24 ccw(c7415.36,887.49) 7429.84,887.49 ccw(c7444.33,887.48) v5@7434.09,877.24 ; v5(7429.84,873) U19.36@7429.84,904.33
DBUSB.FLAGA: U8.AC17 U19.29 | length 4843.5
  Top Layer w4: U8.AC17@5527.8,3808.48 cw(c5527.8,3790.38) 5540.6,3803.18 cw(c5553.4,3815.98) U8.AC17@5535.3,3815.98 ; U8.AC17@5527.8,3808.64 cw(c5527.8,3790.92) 5540.33,3803.45 cw(c5552.86,3815.98) U8.AC17@5535.14,3815.98 ; U8.AC17@5527.8,3815.98 v3(5547.48,3796.3) ; v1@5590,3290.5 cw(c5590,3246.89) 5620.84,3277.73 ; v1@5590,3294.5 cw(c5590,3260.54) 5614.01,3284.55 ; v1@5590,3298.5 cw(c5590,3274.2) 5607.18,3291.38 ; v1(5590,3300) 5596.15,3300 5598.52,3302.37 5598.52,3300.04 5656.86,3241.71 ; v1@5652.02,3233.22 ccw(c5646.99,3241.71) 5656.86,3241.71 ; v1(5656.86,3225.04) 5656.86,3241.71 ; v1@5661.7,3233.22 cw(c5666.73,3241.71) 5656.86,3241.71 ; 5534.68,3809.1 cw(c5521.87,3796.3) 5539.98,3796.3 ccw(c5521.87,3796.3) 5534.68,3809.1 ; 5534.68,3809.1 ccw(c5547.48,3821.91) 5547.48,3803.8 cw(c5547.48,3821.91) 5534.68,3809.1
  MidLayer1 w4: v3@5542.29,3791.11 cw(c5529.75,3778.57) 5547.48,3778.57 cw(c5565.21,3778.57) v3@5552.67,3791.11 ; v3(5547.48,3796.3) 5547.48,3718.62 5547.48,3670 5547.48,3660 5547.48,3565.83 5550.86,3562.45 5550.86,3531.52 5567.5,3514.87 5567.5,3415.73 5590,3393.23 v1(5590,3300) ; v1@5583.28,3306.72 ccw(c5567.06,3322.93) 5590,3322.93 ccw(c5612.93,3322.93) v1@5596.72,3306.72 ; v1@5586.11,3303.89 ccw(c5576.72,3313.28) 5590,3313.28 ccw(c5603.28,3313.28) v1@5593.89,3303.89 ; v1@5656.86,3215.54 cw(c5656.86,3192.61) 5673.08,3208.82 cw(c5689.29,3225.04) v1@5666.36,3225.04 ; v1@5656.86,3219.54 cw(c5656.86,3206.26) 5666.25,3215.65 cw(c5675.64,3225.04) v1@5662.36,3225.04 ; v1(5656.86,3225.04) 5673.52,3208.37 5673.52,2893.33 5681.86,2885 5681.86,2866.71 5723.86,2824.71 5723.86,2675.37 5706.86,2658.37 5706.86,2341.71 5739.5,2309.06 5739.5,2209.06 5756.86,2191.71 6090.19,2191.71 6106.86,2175.04 6106.86,1869.08 6390.81,1585.13 6390.81,1304.5 6372.52,1286.21 6372.52,1146.3 6627.11,891.71 v1(7140.19,891.71) ; v1@7133.47,884.99 ccw(c7117.26,868.77) 7117.26,891.71 ccw(c7117.26,914.64) v1@7133.47,898.43 ; v1@7136.3,887.82 ccw(c7126.91,878.43) 7126.91,891.71 ccw(c7126.91,904.99) v1@7136.3,895.6 ; 5547.48,3778.19 cw(c5565.59,3778.19) 5552.78,3791 ccw(c5565.59,3778.19) 5547.48,3778.19 ; 5547.48,3778.19 ccw(c5529.37,3778.19) 5542.18,3791 cw(c5529.37,3778.19) 5547.48,3778.19
  Bottom Layer w4: v1(7140.19,891.71) 7156.86,908.37 7292.05,908.37 U19.29@7292.05,904.33 ccw(c7282.28,894.57) 7282.28,908.37 ; v1@7140.19,897.21 ccw(c7140.19,910.49) 7149.58,901.1 ccw(c7158.97,891.71) v1@7145.69,891.71 ; v1@7140.19,901.21 ccw(c7140.19,924.14) 7156.41,907.93 ccw(c7172.63,891.71) v1@7149.69,891.71 ; 7272.63,908.37 cw(c7272.63,884.91) U19.29@7289.22,901.5
DBUSB.FLAGB: U8.AB17 U19.30 | length 4974
  Top Layer w4: U8.AB17@5527.8,3847.85 cw(c5527.8,3829.75) 5540.6,3842.55 cw(c5553.4,3855.35) U8.AB17@5535.3,3855.35 ; U8.AB17@5527.8,3848.01 cw(c5527.8,3830.29) 5540.33,3842.82 cw(c5552.86,3855.35) U8.AB17@5535.14,3855.35 ; U8.AB17@5527.8,3855.35 v3(5547.48,3835.67) ; 5534.68,3848.47 cw(c5521.87,3835.67) 5539.98,3835.67 ccw(c5521.87,3835.67) 5534.68,3848.47 ; 5534.68,3848.47 ccw(c5547.48,3861.28) 5547.48,3843.17 cw(c5547.48,3861.28) 5534.68,3848.47
  MidLayer1 w4: v3@5546.83,3828.2 cw(c5545.25,3810.16) 5559.12,3821.8 cw(c5572.99,3833.44) v3@5554.95,3835.02 ; 5558.87,3822.09 cw(c5548.94,3812.16) 5562.99,3812.16 ; 5562.99,3798.23 5562.99,3812.16 ; v1@5580.69,2800.04 ccw(c5557.76,2800.04) 5573.97,2816.26 ccw(c5590.19,2832.48) v1@5590.19,2809.54 ; v1@5584.69,2800.04 ccw(c5571.41,2800.04) 5580.8,2809.43 ccw(c5590.19,2818.82) v1@5590.19,2805.54 ; v1(5590.19,2800.04) 5523.19,2867.04 5523.19,2957.04 5565.19,2999.04 5565.19,3173.67 5609.19,3217.67 5609.19,3316.57 5616.19,3323.57 5616.19,3378.36 5575.5,3419.05 5575.5,3518.19 5558.86,3534.83 5558.86,3641.29 5562.99,3645.43 5562.99,3660 5562.99,3670 5562.99,3718.62 5562.99,3812.16 ; v1@5675.14,2759.99 cw(c5658.92,2743.77) 5681.86,2743.77 cw(c5704.79,2743.77) v1@5688.57,2759.99 ; v1@5677.97,2762.82 cw(c5668.58,2753.43) 5681.86,2753.43 cw(c5695.14,2753.43) v1@5685.75,2762.82 ; v1(5681.86,2766.71) 5681.86,2716.71 5690.19,2708.37 5690.19,2411.35 5681.86,2403.02 5681.86,2175.04 5690.19,2166.71 6073.19,2166.71 6089.86,2150.04 6089.86,1863.45 6374.81,1578.5 6374.81,1389.81 6339.88,1354.88 6339.88,1290.12 6356.52,1273.48 6356.52,1139.67 6654.48,841.71 7248.52,841.71 7279.82,873 v5(7311.73,873) ; v5@7306.08,867.34 ccw(c7292.42,853.68) 7292.42,873 ccw(c7292.42,892.31) v5@7306.08,878.66
  Bottom Layer w4: v1(5590.19,2800.04) 5648.52,2800.04 v1(5681.86,2766.71) ; v1@5594.08,2796.15 cw(c5603.47,2786.76) 5603.47,2800.04 cw(c5603.47,2813.32) v1@5594.08,2803.93 ; v1@5596.91,2793.32 cw(c5613.13,2777.11) 5613.13,2800.04 cw(c5613.13,2822.98) v1@5596.91,2806.76 ; v1@5672.36,2766.71 ccw(c5649.42,2766.71) 5665.64,2782.93 ccw(c5681.86,2799.14) v1@5681.86,2776.21 ; v1@5676.36,2766.71 ccw(c5663.08,2766.71) 5672.47,2776.1 ccw(c5681.86,2785.49) v1@5681.86,2772.21
  Bottom Layer w8: v5@7307.49,877.24 ccw(c7297.25,887.49) 7311.73,887.49 ccw(c7326.22,887.48) v5@7315.97,877.24 ; v5(7311.73,873) U19.30@7311.73,904.33
DBUSB.FLAGC: U8.AA20 U19.31 | length 4486.6
  Top Layer w4: U8.AA20@5645.91,3887.22 cw(c5645.91,3869.12) 5658.71,3881.92 cw(c5671.51,3894.72) U8.AA20@5653.41,3894.72 ; U8.AA20@5645.91,3887.38 cw(c5645.91,3869.66) 5658.44,3882.19 cw(c5670.97,3894.72) U8.AA20@5653.25,3894.72 ; U8.AA20@5645.91,3894.72 v3(5665.59,3875.04) ; 5652.79,3887.84 cw(c5639.98,3875.04) 5658.09,3875.04 ccw(c5639.98,3875.04) 5652.79,3887.84 ; 5652.79,3887.84 ccw(c5665.59,3900.65) 5665.59,3882.54 cw(c5665.59,3900.65) 5652.79,3887.84
  MidLayer1 w4: v3@5664.29,3867.65 cw(c5661.14,3849.82) 5675.98,3860.21 ; v3@5672.98,3873.74 ccw(c5690.81,3870.59) 5675.98,3860.21 ; 5689.45,3798.23 5689.45,3812.16 ; v5@7331.42,927.66 cw(c7331.42,908.35) 7345.07,922 cw(c7358.73,935.66) v5@7339.42,935.66 ; v5(7331.42,935.66) 7350.37,916.71 7415.19,916.71 7431.86,933.37 7431.86,958.37 7415.23,975 7296.71,975 7105,1166.71 6998.52,1166.71 6793.52,1371.71 6793.52,1716.71 6782.86,1727.37 6529.52,1727.37 6215.19,2041.71 6215.19,2333.37 6148.52,2400.04 6076.51,2400.04 5981.52,2495.02 5981.52,2570.63 5906.86,2645.3 5906.86,2762.67 5913.69,2769.5 5913.69,2797.25 5906.86,2804.08 5906.86,2826.04 5915.19,2834.37 5915.19,2905.39 5942.19,2932.39 5942.19,3017.69 5922.19,3037.69 5922.19,3220.73 5956.86,3255.39 5956.86,3266.04 5970,3279.18 5970,3306.54 5923.52,3353.02 5923.52,3462.37 5868.86,3517.04 5776.84,3517.04 5740.19,3553.69 5740.19,3585.71 5705.64,3620.26 5689.45,3636.44 5689.45,3660 5689.45,3670 5689.45,3718.62 5689.45,3738.04 5689.45,3812.16 ; 5675.98,3860.21 5683.06,3851.63 cw(c5665.68,3835.41) 5689.45,3835.41 5689.45,3812.16
  Bottom Layer w8: v5@7327.17,931.42 cw(c7316.93,921.18) 7331.42,921.18 cw(c7345.9,921.18) v5@7335.66,931.42 ; U19.31@7331.42,904.33 v5(7331.42,935.66)
DBUSB.FLAGD_CS_N: U8.AE20 U19.40 | length 4553.5
  Top Layer w4: 5710.37,3470.14 cw(c5690.27,3450.04) v1@5718.69,3450.04 ; 5715.85,3464.65 ccw(c5728.19,3476.99) v1@5728.19,3459.54 ; 5717.19,3463.31 cw(c5703.92,3450.04) v1@5722.69,3450.04 ; v1@5719.86,3450.04 v1(5728.19,3450.04) 5728.19,3452.31 5699.19,3481.31 5699.19,3501 5699.19,3513.44 5655,3557.63 5655,3566.23 5655,3590 5655,3612.25 5661.41,3618.66 5661.41,3660 5661.41,3670 5661.41,3717.53 ; 5658.44,3724.71 cw(c5651.26,3717.53) 5661.41,3717.53 ; 5658.44,3724.71 cw(c5651.26,3717.53) 5661.41,3717.53 ; 5658.44,3724.71 ccw(c5645.91,3712.17) 5645.91,3729.9 cw(c5645.91,3712.17) 5658.44,3724.71 ; 5658.44,3724.71 cw(c5670.97,3737.24) 5653.25,3737.24 ccw(c5670.97,3737.24) 5658.44,3724.71
  MidLayer1 w4: v1(5728.19,3450.04) 5728.19,3441.71 5790.19,3379.71 5790.19,3265.06 5755.86,3230.73 5755.86,3070.65 5840.5,2986 5840.5,2815.81 5847.36,2808.95 5847.36,2768.83 5874.36,2741.83 5874.36,2684.46 5874.19,2684.29 5874.19,2633.01 5874.04,2632.86 5948.52,2558.37 5948.52,2280.37 5970.52,2258.37 6173.52,2258.37 6190.19,2241.71 6190.19,2029.41 6390.19,1829.41 6390.19,1631 6422.81,1598.38 6422.81,1254.82 6431.63,1246 6824.58,1246 7087.21,983.37 7156.86,983.37 v1(7181.86,958.37) ; v1@7172.36,958.37 ccw(c7149.42,958.37) 7165.64,974.59 ccw(c7181.86,990.81) v1@7181.86,967.87 ; v1@7176.36,958.37 ccw(c7163.08,958.37) 7172.47,967.76 ccw(c7181.86,977.15) v1@7181.86,963.87
  MidLayer2 w4: v1(7181.86,958.37) 7501.63,958.37 7508.58,951.42 v5(7508.58,873) ; v1@7185.75,954.49 cw(c7195.14,945.1) 7195.14,958.37 cw(c7195.14,971.65) v1@7185.75,962.26 ; v1@7188.57,951.66 cw(c7204.79,935.44) 7204.79,958.37 cw(c7204.79,981.31) v1@7188.57,965.09 ; v5@7502.93,878.66 ccw(c7489.27,892.31) 7508.58,892.31 ccw(c7527.9,892.31) v5@7514.24,878.66 ; v5@7506.86,873 v5(7508.58,873) ; v5@7510,874.42 v5(7508.58,873)
  Bottom Layer w8: v5@7504.34,877.24 ccw(c7494.1,887.49) 7508.58,887.49 ccw(c7523.07,887.48) v5@7512.83,877.24 ; v5(7508.58,873) U19.40@7508.58,904.33
DBUSB.IFCLK: R112.1 U8.V14 | length 5175.1
  Top Layer w4: U8.V14@5409.69,4005.33 cw(c5409.69,3987.23) 5422.49,4000.03 cw(c5435.29,4012.83) U8.V14@5417.19,4012.83 ; U8.V14@5409.69,4005.49 cw(c5409.69,3987.77) 5422.22,4000.3 cw(c5434.75,4012.83) U8.V14@5417.03,4012.83 ; U8.V14@5409.69,4012.83 v3(5429.37,3993.15) ; 5416.57,4005.95 cw(c5403.76,3993.15) 5421.87,3993.15 ccw(c5403.76,3993.15) 5416.57,4005.95 ; 5416.57,4005.95 ccw(c5429.37,4018.76) 5429.37,4000.65 cw(c5429.37,4018.76) 5416.57,4005.95
  MidLayer1 w4: v1@5382.47,3643.32 cw(c5366.26,3627.11) 5389.19,3627.11 cw(c5412.13,3627.11) v1@5395.91,3643.32 ; v1@5385.3,3646.15 cw(c5375.91,3636.76) 5389.19,3636.76 cw(c5402.47,3636.76) v1@5393.08,3646.15 ; v1(5389.19,3650.04) 5389.19,3618.34 5389.86,3617.67 5389.86,3570.02 5407.7,3552.18 5407.7,3472.26 5415.19,3464.78 5415.19,3408.37 5473.86,3349.71 5473.86,3233.04 5498.52,3208.37 5498.52,3195.37 5490.19,3187.04 5489.68,3187.04 ; 5489.68,3186.53 5462.99,3186.53 5448.52,3172.06 5448.52,2964.25 5434.78,2950.5 5434.44,2950.5 5419.5,2935.56 5419.5,2935.22 5397.52,2913.25 5397.52,2742.71 5440.19,2700.04 5440.19,2578.02 5456.86,2561.35 5456.86,2422.06 5423.52,2388.73 5423.52,1775.04 5831.86,1366.71 5831.86,1275.04 5848.52,1258.37 5939.52,1258.37 6522.86,675.04 6781.86,675.04 6790.19,683.37 v1(7098.52,683.37) ; v1@7091.81,676.66 ccw(c7075.59,660.44) 7075.59,683.37 ccw(c7075.59,706.31) v1@7091.81,690.09 ; v1@7094.64,679.49 ccw(c7085.25,670.1) 7085.25,683.37 ccw(c7085.25,696.65) v1@7094.64,687.26
  Bottom Layer w4: v1(5389.19,3650.04) 5442.04,3650.04 5444.88,3652.88 5444.88,3660 5444.88,3670 5444.88,3876.1 5444.88,3969.64 ccw(c5430.83,3969.64) 5440.76,3979.57 ; v1@5393.08,3646.15 cw(c5402.47,3636.76) 5402.47,3650.04 cw(c5402.47,3663.32) v1@5393.08,3653.93 ; v1@5395.91,3643.32 cw(c5412.13,3627.11) 5412.13,3650.04 cw(c5412.13,3672.98) v1@5395.91,3656.76 ; v3@5428.72,3985.68 cw(c5427.14,3967.64) 5441.01,3979.28 cw(c5454.88,3990.92) v3@5436.84,3992.5 ; v1@7091.81,676.66 cw(c7075.59,660.44) 7098.52,660.44 cw(c7121.46,660.44) v1@7105.24,676.66 ; v1@7094.64,679.49 cw(c7085.25,670.1) 7098.52,670.1 cw(c7111.8,670.1) v1@7102.41,679.49 ; v1(7098.52,683.37) 7098.52,611.48 7115,595 R112.1@7153.82,595 ; R112.1@7147.23,588.41 ccw(c7131.32,572.5) 7131.32,595 ccw(c7131.32,617.5) R112.1@7147.23,601.59 ; R112.1@7150.06,591.24 ccw(c7140.98,582.16) 7140.98,595 ccw(c7140.98,607.84) R112.1@7150.06,598.76
DBUSB.INT_N: R115.1 U8.AF22 U19.34 | length 4507.5
  Top Layer w4: U8.AF22@5719.34,3692.57 cw(c5706.54,3679.77) 5724.65,3679.77 cw(c5742.75,3679.77) U8.AF22@5729.95,3692.57 ; U8.AF22@5719.45,3692.68 cw(c5706.92,3680.15) 5724.65,3680.15 cw(c5742.37,3680.15) U8.AF22@5729.84,3692.68 ; U8.AF22@5724.65,3697.87 5724.65,3670 5724.65,3660 5724.65,3565.19 5731.52,3558.31 5731.52,3533.71 5740.19,3525.04 5748.52,3516.71 v1(5748.52,3491.71) ; v1@5741.81,3498.43 ccw(c5725.59,3514.64) 5748.52,3514.64 ccw(c5771.46,3514.64) v1@5755.24,3498.43 ; v1@5744.64,3495.6 ccw(c5735.25,3504.99) 5748.52,3504.99 ccw(c5761.8,3504.99) v1@5752.41,3495.6 ; v1(7181.86,1033.37) 7375,1033.37 7390.47,1017.9 v5(7390.47,873) ; v1@7185.75,1029.49 cw(c7195.14,1020.1) 7195.14,1033.37 cw(c7195.14,1046.65) v1@7185.75,1037.26 ; v1@7188.57,1026.66 cw(c7204.79,1010.44) 7204.79,1033.37 cw(c7204.79,1056.31) v1@7188.57,1040.09 ; v5@7384.82,878.66 ccw(c7371.16,892.32) 7390.47,892.32 ccw(c7409.78,892.31) v5@7396.13,878.66
  MidLayer1 w4: v1@5748.52,3482.21 cw(c5748.52,3459.27) 5764.74,3475.49 cw(c5780.96,3491.71) v1@5758.02,3491.71 ; v1@5748.52,3486.21 cw(c5748.52,3472.93) 5757.91,3482.32 cw(c5767.3,3491.71) v1@5754.02,3491.71 ; v1(5748.52,3491.71) 5765,3475.23 5765,3428.21 5806.86,3386.36 5806.86,3289.71 5848.94,3247.63 5848.94,3222.74 5815.19,3188.99 5815.19,3022.63 5848.52,2989.29 5848.52,2819.1 5855.36,2812.27 5855.36,2772.14 5882.36,2745.15 5882.36,2681.15 5882.19,2680.98 5882.19,2636.02 5956.86,2561.35 5956.86,2291.71 5981.86,2266.71 6181.86,2266.71 6198.52,2250.04 6198.52,2032.39 6398.52,1832.39 6398.52,1659.71 6495.42,1562.81 6507.38,1562.81 6517.81,1552.38 6517.81,1540.42 6566.86,1491.37 6666.52,1491.37 6675.19,1500.04 6675.19,1523.04 6681.86,1529.71 6751.86,1529.71 6753.52,1528.04 6753.52,1461.71 6781.86,1433.37 6781.86,1300.04 6931.86,1150.04 7065.19,1150.04 v1(7181.86,1033.37) ; v1@7172.36,1033.37 ccw(c7149.42,1033.37) 7165.64,1049.59 ccw(c7181.86,1065.81) v1@7181.86,1042.87 ; v1@7176.36,1033.37 ccw(c7163.08,1033.37) 7172.47,1042.76 ccw(c7181.86,1052.15) v1@7181.86,1038.87
  Bottom Layer w4: v1(7181.86,1033.37) 7196.18,1019.05 R115.1@7196.18,990 ; R115.1@7189.59,997.08 ccw(c7173.68,1012.99) 7196.18,1012.99 ccw(c7218.68,1012.99) R115.1@7202.77,997.08 ; R115.1@7192.42,994.25 ccw(c7183.34,1003.33) 7196.18,1003.33 ccw(c7209.02,1003.33) R115.1@7199.94,994.25
  Bottom Layer w8: v5@7386.23,877.24 ccw(c7375.99,887.49) 7390.47,887.49 ccw(c7404.96,887.48) v5@7394.72,877.24 ; v5(7390.47,873) U19.34@7390.47,904.33
DBUSB.PKTEND: U8.AE21 U19.39 | length 5308.4
  Top Layer w4: v1(5698.86,3550.37) 5701.14,3552.66 5701.14,3613.86 5700.78,3614.22 5700.78,3660 5700.78,3670 5700.78,3717.53 ; 5697.81,3724.71 cw(c5690.63,3717.53) 5700.78,3717.53 ; 5697.81,3724.71 cw(c5690.63,3717.53) 5700.78,3717.53 ; 5697.81,3724.71 ccw(c5685.28,3712.17) 5685.28,3729.9 cw(c5685.28,3712.17) 5697.81,3724.71 ; 5697.81,3724.71 cw(c5710.34,3737.24) 5692.62,3737.24 ccw(c5710.34,3737.24) 5697.81,3724.71
  MidLayer1 w4: v5@7483.24,941.32 ccw(c7469.58,954.98) 7488.9,954.98 ccw(c7508.21,954.98) v5@7494.55,941.32 ; v1(7815.19,3108.37) 7831.86,3108.37 ; v1@7823.36,3103.53 cw(c7831.86,3098.51) 7831.86,3108.37 ; v1@7823.36,3113.22 ccw(c7831.86,3118.24) 7831.86,3108.37 ; v5@7488.9,943.33 v5(7488.9,935.66) 7488.9,933.37 7489.19,933.37 7490.19,934.37 7490.19,942.04 v5@7488.9,943.33 ; v5@7488.9,943.33 7488.9,984.63 7473.52,1000 7473.52,1466.71 7781.86,1775.04 7781.86,1869.65 7778.69,1872.81 7778.69,1944.87 7848.52,2014.71 7848.52,2258.37 7856.86,2266.71 7856.86,2333.37 7831.86,2358.37 7831.86,2966.71 7848.52,2983.37 7848.52,3091.71 7831.86,3108.37
  MidLayer2 w4: v1(5698.86,3550.37) 5698.86,3486.69 5707.19,3478.36 5707.19,3416.37 5723.52,3400.04 5861.86,3400.04 5911.86,3450.04 v1(5965.19,3450.04) ; v1@5958.47,3443.32 ccw(c5942.26,3427.11) 5942.26,3450.04 ccw(c5942.26,3472.98) v1@5958.47,3456.76 ; v1@5961.3,3446.15 ccw(c5951.91,3436.76) 5951.91,3450.04 ccw(c5951.91,3463.32) v1@5961.3,3453.93
  Bottom Layer w4: v1(5965.19,3450.04) 6189.52,3450.04 6190.19,3450.71 6247.86,3450.71 6256.86,3441.71 6583.19,3441.71 6616.52,3475.04 6672.19,3475.04 6705.52,3441.71 6834.23,3441.71 6859.56,3416.37 7173.86,3416.37 7198.52,3391.71 7298.52,3391.71 7509.64,3180.59 7520.23,3170 7610,3170 7625,3185 7738.37,3185 7815,3108.37 v1(7815.19,3108.37) ; 7798.65,3124.73 ccw(c7815.19,3141.27) v1@7815.19,3117.87 ; 7799.11,3124.27 cw(c7783.21,3108.37) v1@7805.69,3108.37 ; 7805.48,3117.9 ccw(c7815.19,3127.61) v1@7815.19,3113.87 ; 7805.94,3117.44 cw(c7796.87,3108.37) v1@7809.69,3108.37
  Bottom Layer w8: v5@7484.66,931.42 cw(c7474.41,921.18) 7488.9,921.18 cw(c7503.38,921.18) v5@7493.14,931.42 ; U19.39@7488.9,904.33 v5(7488.9,935.66)
DBUSB.RD_N: U8.U16 U19.1 | length 6740.7
  Top Layer w4: U8.U16@5488.43,4044.7 cw(c5488.43,4026.6) 5501.23,4039.4 cw(c5514.03,4052.2) U8.U16@5495.93,4052.2 ; U8.U16@5488.43,4044.86 cw(c5488.43,4027.14) 5500.96,4039.67 cw(c5513.49,4052.2) U8.U16@5495.77,4052.2 ; U8.U16@5488.43,4052.2 v3(5508.11,4032.52) ; 5495.31,4045.32 cw(c5482.5,4032.52) 5500.61,4032.52 ccw(c5482.5,4032.52) 5495.31,4045.32 ; 5495.31,4045.32 ccw(c5508.11,4058.13) 5508.11,4040.02 cw(c5508.11,4058.13) 5495.31,4045.32
  MidLayer1 w4: v1@6941.61,2776.86 ccw(c6926.51,2762.61) 6926.51,2783.37 ; v1@6941.61,2789.89 cw(c6926.51,2804.14) 6926.51,2783.37 ; v1@6944.52,2779.6 ccw(c6935.78,2771.35) 6935.78,2783.37 ccw(c6935.78,2795.4) v1@6944.52,2787.15 ; v1(6948.52,2783.37) 6926.51,2783.37 ; v1@7575.14,984.99 ccw(c7558.92,968.77) 7558.92,991.71 ccw(c7558.92,1014.64) v1@7575.14,998.43 ; v1@7577.97,987.82 ccw(c7568.58,978.43) 7568.58,991.71 ccw(c7568.58,1004.99) v1@7577.97,995.6 ; v1(7581.86,991.71) 7556.86,991.71 7531.86,1016.71 7531.86,1083.37 7515.19,1100.04 7498.52,1100.04 7481.86,1083.37 7481.86,1010 7506.86,985 7506.86,925.04 7498.52,916.71 7474.19,916.71 7465.86,925.04 7465.86,950.04 7456.86,959.04 7456.86,1225.04 7431.86,1250.04 7006.86,1250.04 6990.19,1266.71 6990.19,1490.04 6989.19,1491.04 6920.19,1491.04 6911.19,1500.04 6911.19,1850.04 6894.52,1866.71 6731.86,1866.71 6715.19,1883.37 6715.19,1916.71 6707.19,1924.71 6683.52,1924.71 6674.86,1933.37 6674.86,2308.37 6691.52,2325.04 6712.19,2325.04 6765.19,2378.04 6765.19,2610.75 6906.86,2752.41 6906.86,2763.73 6926.51,2783.37
  MidLayer2 w4: v1(6081.86,3491.71) 6198.52,3491.71 6220.09,3470.14 6281.86,3408.37 6315.19,3408.37 6373.52,3350.04 6668.5,3350.04 6715.19,3303.35 6715.19,3233.37 6948.52,3000.04 v1(6948.52,2783.37) ; v1@6085.75,3487.82 cw(c6095.14,3478.43) 6095.14,3491.71 cw(c6095.14,3504.99) v1@6085.75,3495.6 ; v1@6088.57,3484.99 cw(c6104.79,3468.77) 6104.79,3491.71 cw(c6104.79,3514.64) v1@6088.57,3498.43 ; v1@6941.81,2790.09 ccw(c6925.59,2806.31) 6948.52,2806.31 ccw(c6971.46,2806.31) v1@6955.24,2790.09 ; v1@6944.64,2787.26 ccw(c6935.25,2796.65) 6948.52,2796.65 ccw(c6961.8,2796.65) v1@6952.41,2787.26 ; v1@7575.14,984.99 cw(c7558.92,968.77) 7581.86,968.77 cw(c7604.79,968.77) v1@7588.57,984.99 ; v1@7577.97,987.82 cw(c7568.58,978.43) 7581.86,978.43 cw(c7595.14,978.43) v1@7585.75,987.82 ; v1(7581.86,991.71) 7581.86,618.14 7599.96,600.04 v1(7631.86,600.04) ; v1@7625.14,593.32 ccw(c7608.92,577.11) 7608.92,600.04 ccw(c7608.92,622.98) v1@7625.14,606.76 ; v1@7627.97,596.15 ccw(c7618.58,586.76) 7618.58,600.04 ccw(c7618.58,613.32) v1@7627.97,603.93
  Bottom Layer w4: v3@5507.46,4025.05 cw(c5505.88,4007.01) 5519.75,4018.65 ; v3@5515.58,4031.87 ccw(c5533.62,4030.29) 5519.75,4018.65 ; 5574.95,3534.95 5649.9,3460 5649.9,3436.42 5661.23,3425.08 5765.76,3425.08 5772.46,3418.37 5791.86,3418.37 5873.52,3500.04 5955,3500.04 5979.84,3500 5988.13,3491.71 v1(6081.86,3491.71) ; 5575,3535 5554.99,3555.01 5554.99,3626.98 5531.97,3650 5531.97,3660 5531.97,3670 5531.97,3876.1 5531.97,3895.52 5531.97,3969.64 5531.97,3989.14 ccw(c5490.24,3989.14) 5519.75,4018.65 ; v1@6075.14,3484.99 ccw(c6058.92,3468.77) 6058.92,3491.71 ccw(c6058.92,3514.64) v1@6075.14,3498.43 ; v1@6077.97,3487.82 ccw(c6068.58,3478.43) 6068.58,3491.71 ccw(c6068.58,3504.99) v1@6077.97,3495.6 ; U19.1@7550.78,592.84 cw(c7568.16,575.46) 7568.16,600.04 ; 7558.51,600.04 ccw(c7558.51,585.12) U19.1@7547.95,595.67 7547.95,600.04 v1(7631.86,600.04) ; v1@7625.14,593.32 ccw(c7608.92,577.11) 7608.92,600.04 ccw(c7608.92,622.98) v1@7625.14,606.76 ; v1@7627.97,596.15 ccw(c7618.58,586.76) 7618.58,600.04 ccw(c7618.58,613.32) v1@7627.97,603.93